# Altium PCB DC-Motor-Driver-v2.0.PcbDoc (part 3 of 5)
Units mil, origin at the board's own origin, x right, y up, seen from the top; angles counter-clockwise.
Board outline 3074 x 1810 mil, 4 copper layers (Top Layer, Signal 1, Signal 2, Bottom Layer), stack 62.055 mil thick; 232 components, 182 nets, 976 pads, 361 vias.
Unrouted connection lines stored in the file: 36.
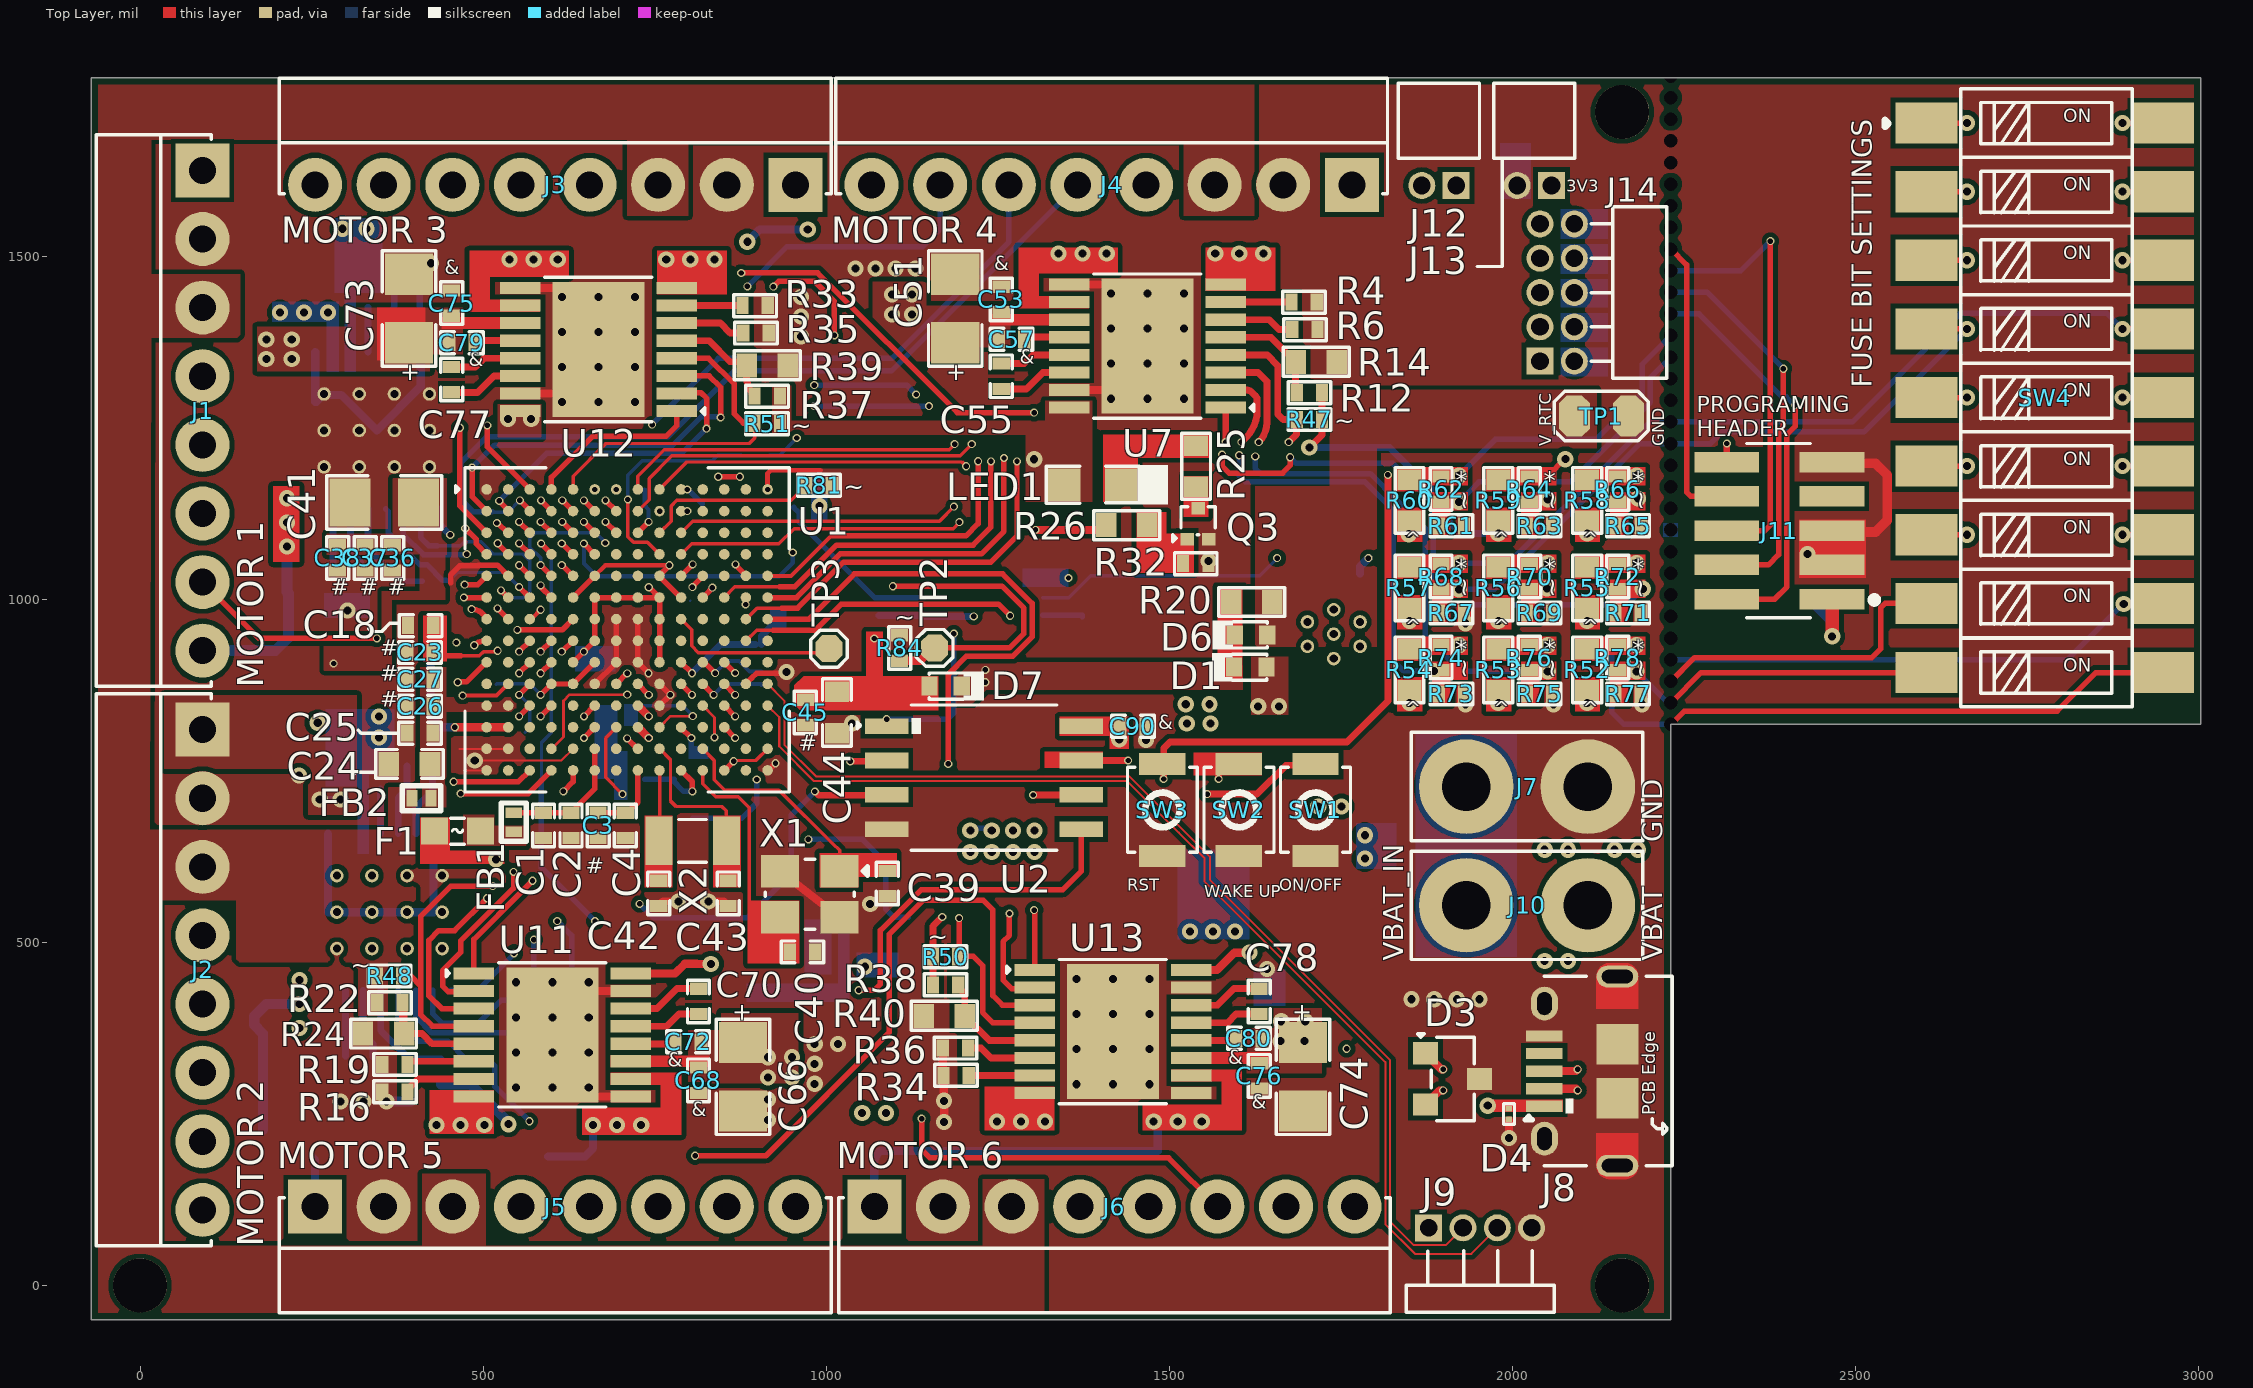
[diagram p0: Top Layer view]

## Part data (continued)
U1: "IC MCU 32BIT EXT MEM 196LFBGA", Manufacturer="NXP Semiconductors", Supplier Part Number=568-MIMXRT1062DVJ6B-ND, Category=Uncategorized, Manufacturer Part Number=MIMXRT1062DVJ6B, Pricing="1=15.93, 10=12.734, 189=10.75497, 567=10.68896, 945=10.09187 (USD)", RoHS=Yes, Stock=1142, Supplier=Digi-Key
U2: "IC FLASH 64MBIT SPI/QUAD 8SOIC", Case/Package=SOIC, Frequency=133MHz, LCSC Part Number=C5362615, Manufacturer=Winbond, Max Operating Temperature=85°C, Min Operating Temperature=-40°C, Supplier Part Number=1882666P, Category=Flash, ComponentLink1Description=http://www.winbond.com/resource-files/w25q64jv%20revj%2003272018%20plus.pdf?src-supplier=Digi-Key, ComponentLink1URL=http://www.winbond.com/resource-files/w25q64jv%20revj%2003272018%20plus.pdf?src-supplier=Digi-Key, Item Type=IC, Manufacturer Part Number=W25Q64JVSSIM, Memory Format=Non-Volatile,FLASH, Memory Size=64Mb, Mounting Technology="Surface Mount", Packaging=Rail/Tube, Pricing="20=0.818, 50=0.796, 100=0.776, 250=0.756 (GBP)", RoHS=Yes, RoHS Compliant=Yes, Series=SpiFlash®, Stock=300, Supplier=Rs
U3: "3-Pin uP Reset Circuits with Ope", LCSC Part Number=C620009, Manufacturer="Union Semiconductor", Item Type=IC, Manufacturer Part Number=UM803RS, Pricing="1=0.1121 (USD)", RoHS=No, Stock=2840, Supplier="Arrow Electronics", Supplier Part Number=UM803RS
U4: "IC EEPROM 64KBIT I2C 8UFDFPN", LCSC Part Number=C283446, Manufacturer=STMicroelectronics, Supplier Part Number=511-M24C64-FMC6TG, Category=EEPROM, ComponentLink1Description=https://datasheet.ciiva.com/1911/cd00259166-1911984.pdf?src-supplier=Digi-Key, ComponentLink1URL=https://datasheet.ciiva.com/1911/cd00259166-1911984.pdf?src-supplier=Digi-Key, Item Type=IC, Manufacturer Part Number=M24C64-FMC6TG, Pricing="1=0.41, 10=0.372, 50=0.372, 100=0.335, 1000=0.301, 10000=0.255 (USD)", RoHS=Yes, Stock=25767, Supplier=Mouser